# Altium PCB PCB_Palm_v2.0.PcbDoc (part 2 of 3)
Units mil, origin at the board's own origin, x right, y up, seen from the top; angles counter-clockwise.
Board outline 1773 x 1966 mil, 4 copper layers (Top Layer, Signal_1, Signal_2, Bottom Layer), stack 62.008 mil thick; 91 components, 87 nets, 389 pads, 224 vias.
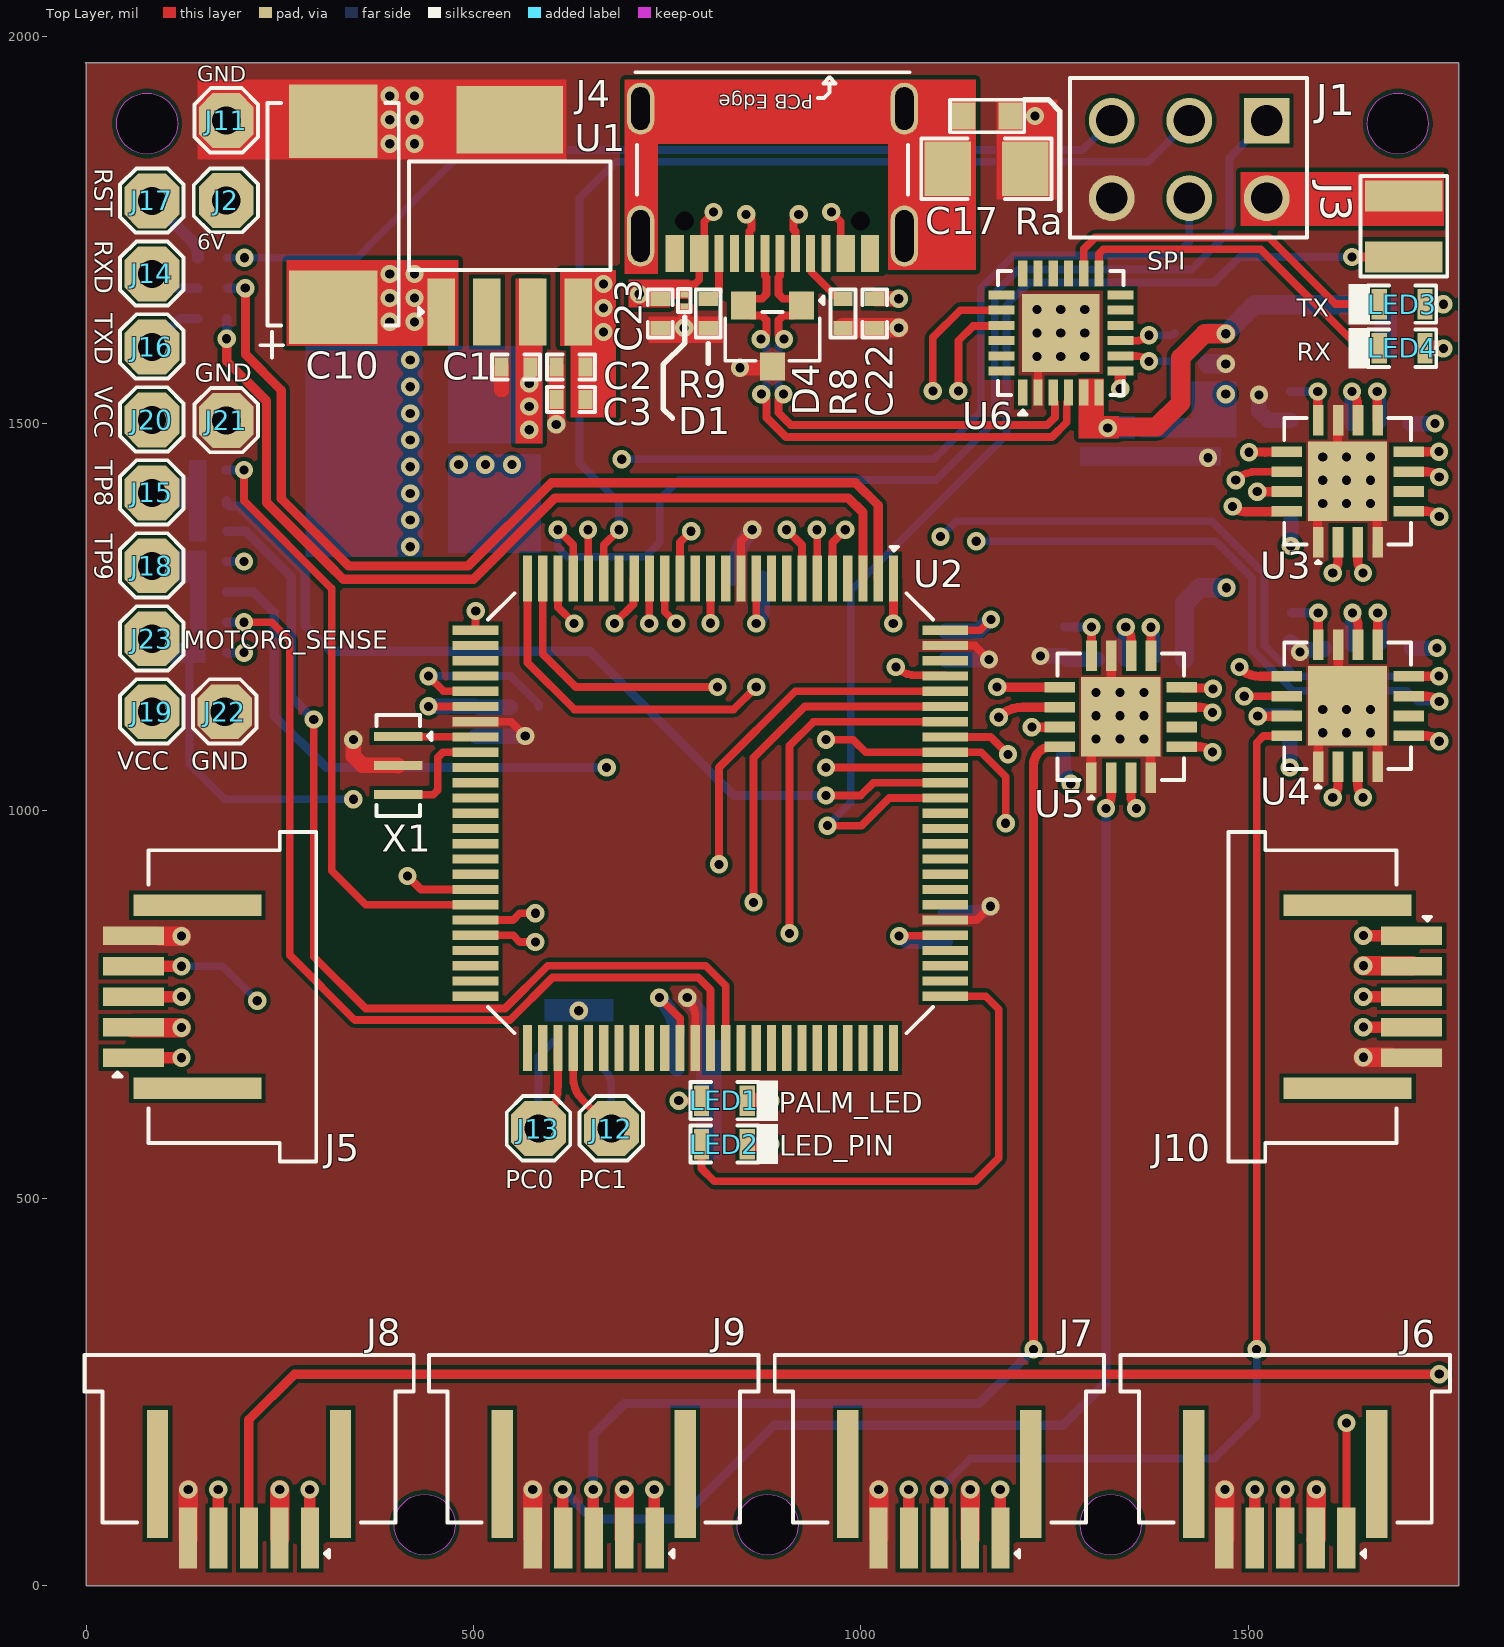
[diagram p0: Top Layer view]

## Part data (continued)
R21 R22: library part RC0402FR-07470RL, "RES 470 OHM 1% 1/16W 0402", Case Code (Imperial)=0402, Case Code (Metric)=1005, LCSC Part Number=C114877, MANUFACTURER=Yageo, Max Operating Temperature=155°C, Max Power Dissipation=63mW, Min Operating Temperature=-55°C, Package Quantity=1, Power Rating=62.5mW, Resistance Tolerance=1%, Resistor Type="Thick Film", Temperature Coefficient=100ppm/°C, Voltage Rating=50V, Case/Package=0402, ComponentLink1Description=https://datasheet.ciiva.com/46412/1018594-46412838.pdf?src-supplier=Element14, ComponentLink1URL=https://datasheet.ciiva.com/46412/1018594-46412838.pdf?src-supplier=Element14, ComponentLink2Description=https://datasheet.ciiva.com/2453/pyu-r-int-thick-7-2453377.pdf?src-supplier=Digikey, ComponentLink2URL=https://datasheet.ciiva.com/2453/pyu-r-int-thick-7-2453377.pdf?src-supplier=Digikey, ComponentLink3Description=https://datasheet.ciiva.com/2453/pyu-r-int-thick-7-2453378.pdf?src-supplier=Digikey, ComponentLink3URL=https://datasheet.ciiva.com/2453/pyu-r-int-thick-7-2453378.pdf?src-supplier=Digikey, ComponentLink4Description=https://datasheet.ciiva.com/2453/pyu-r-int-thick-7-2453376.pdf?src-supplier=Digikey, ComponentLink4URL=https://datasheet.ciiva.com/2453/pyu-r-int-thick-7-2453376.pdf?src-supplier=Digikey, ComponentLink5Description=https://datasheet.ciiva.com/7850/1018594-7850015.pdf?src-supplier=Element14, ComponentLink5URL=https://datasheet.ciiva.com/7850/1018594-7850015.pdf?src-supplier=Element14, ComponentLink6Description=https://datasheet.ciiva.com/7850/1018594-7850014.pdf?src-supplier=Element14, ComponentLink6URL=https://datasheet.ciiva.com/7850/1018594-7850014.pdf?src-supplier=Element14, ComponentLink7Description=https://datasheet.ciiva.com/15189/getdatasheetpartid-330246-15189463.pdf?src-supplier=Verical, ComponentLink7URL=https://datasheet.ciiva.com/15189/getdatasheetpartid-330246-15189463.pdf?src-supplier=Verical, Construction=Rectangular, Depth=0.5mm, Features="Moisture Resistant", Height=0.016inch, Item Type=Resistor, Lead Free="Lead Free", Length=1mm, Manufacturer Part Number=RC0402FR-07470RL, Military Standard=Not, Number of Terminations=2, Packaging="Tape and Reel", Pricing="10000=0.00085 (USD)", Reach SVHC Compliant=No, RoHS=Yes, RoHS Compliant=Yes, Series=RC, Stock=10000, Supplier=Avnet, Supplier Part Number=RC0402FR-07470RL, Termination=SMD/SMT, Tolerance=1%, Voltage Rating (AC)=50V, Width=0.02inch, Working Voltage=50V
R23: library part RT0402BRD0722K1L, "RES SMD 22.1KOHM 0.1% 1/16W 0402", Case Code (Imperial)=0402, Case Code (Metric)=1005, LCSC Part Number=C852648, MANUFACTURER=Yageo, Max Operating Temperature=155°C, Max Power Dissipation=63mW, Min Operating Temperature=-55°C, Package Quantity=10000, Power Rating=62.5mW, Temperature Coefficient=25ppm/°C, Tolerance=0.1%, Voltage Rating=50V, Case/Package=0402, Category="Chip SMD Resistors", ComponentLink1Description=https://datasheet.ciiva.com/2582/pyu-rt-1-to-0-05-rohs-l-5-2582235.pdf?src-supplier=Digi-Key, ComponentLink1URL=https://datasheet.ciiva.com/2582/pyu-rt-1-to-0-05-rohs-l-5-2582235.pdf?src-supplier=Digi-Key, ComponentLink2Description=https://datasheet.ciiva.com/12797/pyu-rt-1-to-0-05-rohs-l-4-12797086.pdf?src-supplier=Mouser, ComponentLink2URL=https://datasheet.ciiva.com/12797/pyu-rt-1-to-0-05-rohs-l-4-12797086.pdf?src-supplier=Mouser, Height=0.014inch, Item Type=Resistor, Lead Free="Lead Free", Length=0.039inch, Manufacturer Part Number=RT0402BRD0722K1L, Number of Terminations=2, Packaging="Tape and Reel", Pricing 1="10000=0.0417, 20000=0.0733, 30000=0.041, 40000=0.0719, 50000=0.0402, 100000=0.0393 (USD)", RoHS=Yes, RoHS Compliant=Yes, Series=RT, Stock 1=40000, Supplier 1="Arrow Electronics", Supplier Part Number 1=RT0402BRD0722K1L, Termination=SMD/SMT, Voltage Rating (DC)=50V, Weight=2.3E-05oz, Width=0.5mm
R24: library part 0402WGF4752TCE, "62.5mW Thick Film Resistors 50V ±100ppm/℃ ±1% 47.5kΩ 0402 Chip Resistor - Surface Mount ROHS", LCSC Part Number=C25896, MANUFACTURER=Uniroyal, Item Type=Resistor, Manufacturer Part Number=0402WGF4752TCE, RoHS=No, Supplier=LCSC
Ra: library part RC0603FR-071ML, "RES SMD 1M OHM 1% 1/10W 0603", Case Code (Imperial)=0603, Case Code (Metric)=1608, LCSC Part Number=C105578, MANUFACTURER=Yageo, Max Operating Temperature=155°C, Min Operating Temperature=-55°C, Package Quantity=5000, Power Rating=100mW, Resistance=1MR, Supplier Part Number 1=311-1.00MHRDKR-ND, Temperature Coefficient=100ppm/°C, Tolerance=1%, Voltage Rating=50V, Case/Package=0603, ComponentLink1Description=http://www.farnell.com/datasheets/2167052.pdf?src-supplier=Mouser, ComponentLink1URL=http://www.farnell.com/datasheets/2167052.pdf?src-supplier=Mouser, ComponentLink2Description=http://www.farnell.com/datasheets/2167052.pdf?src-supplier=Element14, ComponentLink2URL=http://www.farnell.com/datasheets/2167052.pdf?src-supplier=Element14, ComponentLink3Description=http://documents.rs-components.com/techlib://itc_doclist_GB.htm?stockno=5048956&src-supplier=RSComponents, ComponentLink3URL=http://documents.rs-components.com/techlib://itc_doclist_GB.htm?stockno=5048956&src-supplier=RSComponents, Composition="Thick Film", Depth=0.8mm, Height=0.45mm, Item Type=Resistor, Lead Free="Lead Free", Length=1.6mm, Manufacturer Part Number=RC0603FR-071ML, Military Standard=Not, Number of Pins=2, Packaging="Tape and Reel", Pricing 1="1=0.1, 10=0.023, 100=0.0094, 1000=0.00421, 2500=0.00366 (USD)", REACH SVHC="No SVHC", Stock 1=3824601, Supplier 1=Digi-Key, Termination=SMD/SMT, Voltage Rating (DC)=50V, Width=0.8mm
U1: "IC REG LINEAR 5V 1A SOT223-5", LCSC Part Number=C28191, MANUFACTURER="Texas Instruments", Supplier Part Number=926-38692MP-5.0/NOPB, ComponentLink1Description=https://datasheet.ciiva.com/6596/lp38690-6596184.pdf?src-supplier=Digikey, ComponentLink1URL=https://datasheet.ciiva.com/6596/lp38690-6596184.pdf?src-supplier=Digikey, ComponentLink2Description=https://datasheet.ciiva.com/6596/lp38690-6596185.pdf?src-supplier=Digikey, ComponentLink2URL=https://datasheet.ciiva.com/6596/lp38690-6596185.pdf?src-supplier=Digikey, ComponentLink3Description=https://datasheet.ciiva.com/6596/lp38690-6596186.pdf?src-supplier=Digikey, ComponentLink3URL=https://datasheet.ciiva.com/6596/lp38690-6596186.pdf?src-supplier=Digikey, ComponentLink4Description=https://datasheet.ciiva.com/14278/lp38692-14278796.pdf?src-supplier=Avnet, ComponentLink4URL=https://datasheet.ciiva.com/14278/lp38692-14278796.pdf?src-supplier=Avnet, ComponentLink5Description=https://datasheet.ciiva.com/22704/1854710-22704677.pdf?src-supplier=Element14, ComponentLink5URL=https://datasheet.ciiva.com/22704/1854710-22704677.pdf?src-supplier=Element14, Item Type=LDO, Manufacturer Part Number=LP38692MP-5.0/NOPB, Pricing="1=2.01, 10=1.71, 50=1.71, 100=1.45, 1000=0.91, 10000=0.888 (USD)", RoHS=Yes, Stock=1461, Supplier=Mouser, Thickness=1.6mm
U2: "IC MCU 8BIT 256KB FLASH 100TQFP", Case/Package=A, Frequency=16MHz, LCSC Part Number=C22460, MANUFACTURER=Microchip, Max Operating Temperature=85°C, Max Supply Voltage=5.5V, Min Operating Temperature=-40°C, Min Supply Voltage=4.5V, Operating Supply Voltage=5V, Package Body Material=Plastic, Package Code=TFQFP, Package Quantity=90, Package Shape=Square, Peak Reflow Temperature (Cel)=260°C, Supplier Part Number 1=68T2776, Temperature Grade=INDUSTRIAL, Time @ Peak Reflow Temperature-Max (s)=40s, Access Time=16us, Category=Uncategorized, ComponentLink1Description=https://datasheet.ciiva.com/22651/1698622-22651116.pdf?src-supplier=Farnell, ComponentLink1URL=https://datasheet.ciiva.com/22651/1698622-22651116.pdf?src-supplier=Farnell, ComponentLink2Description=https://datasheet.ciiva.com/15122/getdatasheetpartid-134542-15122545.pdf?src-supplier=Verical, ComponentLink2URL=https://datasheet.ciiva.com/15122/getdatasheetpartid-134542-15122545.pdf?src-supplier=Verical, ComponentLink3Description=https://datasheet.ciiva.com/29119/154804-da-01-en-atmega2560-16au-tqfp-100-29119580.pdf?src-supplier=Conrad, ComponentLink3URL=https://datasheet.ciiva.com/29119/154804-da-01-en-atmega2560-16au-tqfp-100-29119580.pdf?src-supplier=Conrad, ComponentLink4Description=https://datasheet.ciiva.com/6640/atmel-2549-8-bit-avr-microcontroller-atmega640-1280-1281-2560-2561-summary-6640293.pdf?src-supplier=Digi-Key, ComponentLink4URL=https://datasheet.ciiva.com/6640/atmel-2549-8-bit-avr-microcontroller-atmega640-1280-1281-2560-2561-summary-6640293.pdf?src-supplier=Digi-Key, ComponentLink5Description=https://datasheet.ciiva.com/1162/33246-1162139.pdf?src-supplier=Farnell, ComponentLink5URL=https://datasheet.ciiva.com/1162/33246-1162139.pdf?src-supplier=Farnell, ComponentLink6Description=https://datasheet.ciiva.com/1157/1817551-1157521.pdf?src-supplier=Element14, ComponentLink6URL=https://datasheet.ciiva.com/1157/1817551-1157521.pdf?src-supplier=Element14, ComponentLink7Description=https://datasheet.ciiva.com/16936/70123980-16936268.pdf?src-supplier=Allied+Electronics, ComponentLink7URL=https://datasheet.ciiva.com/16936/70123980-16936268.pdf?src-supplier=Allied+Electronics, Core Architecture=AVR, Data Bus Width=8b, Density=256KB, Height=1.05mm, Interface=I2C,SPI,UART,USART,EBI/EMI,2-Wire, Item Type=IC, JESD-30 Code=S-PQFP-G100, Lead Free="Lead Free", Length=14.1mm, Manufacturer Part Number=ATMEGA2560-16AU, Max Frequency=16MHz, Memory Size=256KB, Memory Type=FLASH, Moisture Sensitivity Level=3, Mount="Surface Mount", Number of ADC Channels=16, Number of I2C Channels=1, Number of I/O Lines=86, Number of I/Os=86, Number of Pins=100, Number of Programmable I/O=86, Number of PWM Channels=12, Number of SPI Channels=1, Number of Terminals/Pins=100, Number of Timers/Counters=6, Oscillator Type=Internal, Packaging=Tray, Peripherals="PWM,Brown-out Detect/Reset,POR,WDT", Pricing 1="1=12.70000 (USD)", Radiation Hardening=No, RAM Size=8KB, Reach SVHC Compliant=Yes, RoHS=Yes, RoHS Compliant=Yes, Series="AVR® ATmega", Stock 1=4, Supplier 1=Avnet, Surface Mount=Yes, Technology=CMOS, Terminal Finish=Tin, Terminal Form="Gull Wing", Terminal Position=QUAD, Termination=SMD/SMT, Watchdog Timer=Yes, Width=14.1mm
U3 U4 U5: "IC MOTOR DRIVER PAR 16QFN", LCSC Part Number=C154936, MANUFACTURER="Texas Instruments", Supplier Part Number=595-DRV8833RTYR, ComponentLink1Description=https://datasheet.ciiva.com/15109/getdatasheetpartid-567030-15109665.pdf?src-supplier=Verical, ComponentLink1URL=https://datasheet.ciiva.com/15109/getdatasheetpartid-567030-15109665.pdf?src-supplier=Verical, ComponentLink2Description=https://datasheet.ciiva.com/3229/drv8833-3229034.pdf?src-supplier=Avnet, ComponentLink2URL=https://datasheet.ciiva.com/3229/drv8833-3229034.pdf?src-supplier=Avnet, ComponentLink3Description=https://datasheet.ciiva.com/1959/drv8833-1959716.pdf?src-supplier=Digikey, ComponentLink3URL=https://datasheet.ciiva.com/1959/drv8833-1959716.pdf?src-supplier=Digikey, ComponentLink4Description=https://datasheet.ciiva.com/1959/drv8833-1959717.pdf?src-supplier=Digikey, ComponentLink4URL=https://datasheet.ciiva.com/1959/drv8833-1959717.pdf?src-supplier=Digikey, ComponentLink5Description=https://datasheet.ciiva.com/1959/drv8833-1959718.pdf?src-supplier=Digikey, ComponentLink5URL=https://datasheet.ciiva.com/1959/drv8833-1959718.pdf?src-supplier=Digikey, Item Type=IC, Manufacturer Part Number=DRV8833RTYR, Pricing="1=1.6, 10=1.36, 50=1.36, 100=1.16, 1000=0.954, 10000=0.875 (USD)", RoHS=Yes, Stock=2803, Supplier=Mouser
U6: "IC USB TO UART BRIDGE QFN24", LCSC Part Number=C969151, MANUFACTURER="Silicon Labs", Category="Interface ICs", ComponentLink1Description=https://www.silabs.com/documents/public/data-sheets/cp2102n-datasheet.pdf?src-supplier=Digi-Key, ComponentLink1URL=https://www.silabs.com/documents/public/data-sheets/cp2102n-datasheet.pdf?src-supplier=Digi-Key, Item Type=IC, Manufacturer Part Number=CP2102N-A02-GQFN24R, Pricing 1="1=2.66900, 10=2.64300, 25=2.61700, 100=2.59000, 250=2.56400 (USD)", RoHS=Yes, Stock 1=321, Supplier 1="Arrow Electronics", Supplier Part Number 1=CP2102N-A02-GQFN24R
X1: "CERAMIC RES 16.0000MHZ 15PF SMD", Case/Package=SMD/SMT, Frequency=16MHz, Frequency Stability=0.13%, Frequency Tolerance=0.07%, LCSC Part Number=C882605, MANUFACTURER=Murata, Max Operating Temperature=125°C, Min Operating Temperature=-40°C, Supplier Part Number=4126216, ComponentLink1Description=https://www.murata.com/en/products/productdata/8801162264606/SPEC-CSTNE16M0VH3C000R0.pdf?src-supplier=Digikey, ComponentLink1URL=https://www.murata.com/en/products/productdata/8801162264606/SPEC-CSTNE16M0VH3C000R0.pdf?src-supplier=Digikey, Impedance=40R, Item Type=Crystal, Manufacturer Part Number=CSTNE16M0VH3C000R0, Mounting Technology="Surface Mount", Packaging="Cut Tape", Pricing="3000=0.168, 6000=0.164, 9000=0.162, 12000=0.161, 15000=0.157 (USD)", RoHS=Yes, RoHS Compliant=Yes, Series="CERALOCK® CSTNE", Stock=3000, Supplier="Future Electronics"

## Via types
v1: diameter 23.62, hole 11.81, Top Layer to Bottom Layer, tented both sides, 223 vias
v2: diameter 23.62, hole 11.81, Top Layer to Bottom Layer, 1 vias

## Nets (pads, with @x,y where several pads share a name; then routed paths per layer and width w, separated by ;. In a path a pad name is that pad's centre, name@x,y a point inside that pad or via, vN(x,y) a via of type N, cw(c..) or ccw(c..) an arc to the next point about the centre after c; other vN are vias at no path point)
6V: C2.2 C3.2 C10.1 C11.2 C12.2 C14.2 C15.2 C18.2 C19.2 J2.1 U1.1 U1.4 U3.10 U4.10 U5.10 | length 487.6
  Top Layer w10: 658,1521.58 658,1562.58 ; 659.5,1563.08 660,1562.58 ; 660,1521.58 660.5,1521.08
  Top Layer w12: v1(1342.07,1237.42) cw(c1325.17,1220.52) 1349.07,1220.52 U5.10@1349.07,1200.42 ; v1(1633.98,1541.36) cw(c1617.08,1524.46) 1640.98,1524.46 1640.98,1504.36 U3.10@1641.74,1505.12 ; v1(1634.72,1255.64) cw(c1617.82,1238.74) 1641.72,1238.74 U4.10@1641.72,1214.58
  Bottom Layer w12: v1@1341.91,1237.26 v1(1342.07,1237.42) ; v1(1633.98,1541.36) v1@1634.5,1540.84
  Bottom Layer w20: C19.2@1341.91,1196.06 v1@1341.91,1237.26 ; C12.2@1634.5,1500 v1@1634.5,1540.84 ; C15.2@1635.24,1214.28 v1@1635.24,1255.12 ; C11.2@1709.5,1500 v1(1741.26,1500) ; C14.2@1710.24,1210.22 v1(1743.81,1210.22)
  Bottom Layer w25: C18.2@1417.91,1196.06 1417.91,1267.91 1438,1288 v1(1472,1288)
  other v1: 668,1618.25 392,1631.25 424,1631.25 668,1649.12 392,1662.12 424,1662.12 668,1680 392,1693 424,1693
22_BREAKOUT: U2.78
23_BREAKOUT: U2.77
A1_M1: J5.3 U3.16 | length 2020.1
  Top Layer w12: v1@1479.47,1392.93 ccw(c1495.94,1409.39) 1495.94,1386.11 U3.16@1549.58,1386.11
  Top Layer w15: J5.3@59.61,760.24 v1@124.29,760.24
  Signal_2 w12: v1(123.29,760.24) 170.24,760.24 234,824 234,1249 283,1298 674,1298 788,1412 1460.93,1412 v1(1480,1392.93)
A1_M3: J7.3 U4.16 | length 1424.9
  Top Layer w10: v1(1511,305) 1511,1088 1519.84,1096.84 U4.16@1549.58,1096.84
  Top Layer w15: J7.3@1101.33,60.32 v1@1101.33,125
  Bottom Layer w10: v1(1101.33,124) 1141.33,164 1456,164 1511,219 v1(1511,305)
A1_M5: J9.3 U5.16 | length 1551
  Top Layer w12: v1(1223,305) 1223,1059.1 cw(c1246.9,1059.1) 1230,1076 cw(c1246.13,1059.88) 1246.13,1082.68 U5.16@1256.93,1082.68
  Top Layer w15: J9.3@654.67,60.32 v1@654.67,125
  Bottom Layer w12: v1(654.67,124) 654.67,194.67 695,235 1153,235 v1(1223,305)
A2_M1: J5.4 U3.2 | length 2195.8
  Top Layer w12: v1(1609.1,1307.2) ccw(c1592.64,1323.66) 1615.92,1323.66 U3.2@1615.92,1346.88
  Top Layer w15: J5.4@59.61,799.59 v1(123.29,799.59)
  Signal_2 w10: v1(221,755) 250,784 250,1239 293,1282 744,1282 856,1394 1432,1394 1460,1366 1583,1366 1609.1,1339.9 v1(1609.1,1307.2)
  Bottom Layer w10: v1(123.29,799.59) 176.41,799.59 v1(221,755)
A2_M3: J7.4 U4.2 | length 1604.7
  Top Layer w12: v1(1609.1,1017.42) ccw(c1592.64,1033.88) 1615.92,1033.88 U4.2@1615.92,1057.1
  Top Layer w15: J7.4@1061.98,60.32 v1(1061.98,124)
  Signal_1 w12: v1(1061.98,124) 1100.98,163 1633,163 1691,221 1691,935.52 v1(1609.1,1017.42)
A2_M5: J9.4 U5.2 | length 1635.9
  Top Layer w12: v1(1316.45,1003.26) ccw(c1299.99,1019.72) 1323.27,1019.72 U5.2@1323.27,1042.94
  Top Layer w15: J9.4@615.32,60.32 v1(615.32,124)
  Bottom Layer w12: v1(615.32,124) 653.32,86 767,86 888,207 1261,207 1316.45,262.45 v1(1316.45,1003.26)
ADC8_BREAKOUT: J3.2 R2.2 U2.89 | length 1517.4
  Top Layer w10: v1(957,981) 1001,981 1036.69,1016.68 U2.89@1109.15,1016.68
  Top Layer w12: v1(1634,1715) J3.2@1700.74,1715
  Bottom Layer w10: v1(957,981) 987,1011 987,1284 1188,1485 1188,1652.79 1217.21,1682 1456,1682 1489,1715 v1(1634,1715)
  Bottom Layer w12: v1(1634,1715) R2.2@1678.5,1715
ADC9_BREAKOUT: U2.88
B1_M2: J6.3 U3.5 | length 1504
  Top Layer w12: U3.5@1707.06,1386.62 1730.28,1386.62 cw(c1730.28,1363.34) v1(1746.74,1379.8)
  Top Layer w15: J6.3@1548,60.32 v1(1548,124) v1@1548,125
  Signal_2 w10: v1(1548,124) 1578,154 1680,154 1722,196 1722,1355.06 v1(1746.74,1379.8)
B1_M4: J8.3 U4.5 | length 2573.4
  Top Layer w12: J8.3@210,60.32 210,214 269,273 v1(1746.74,273) ; U4.5@1707.06,1096.84 1730.28,1096.84 cw(c1730.28,1073.55) v1(1746.74,1090.02)
  Signal_2 w12: v1(1746.74,273) v1(1746.74,1090.02)
B1_M6: J10.3 U5.5 | length 550.4
  Top Layer w12: U5.5@1414.41,1082.68 1437.62,1082.68 cw(c1437.62,1059.4) v1(1454.08,1075.86)
  Top Layer w15: v1@1647.67,760.24 J10.3@1712.35,760.24
  Signal_1 w12: v1(1454.08,1075.86) 1488.14,1075.86 1556,1008 1556,805 1600.76,760.24 v1(1648.67,760.24)
B2_M2: J6.4 U3.3 | length 1477.3
  Top Layer w12: U3.3@1641.52,1346.88 1641.52,1323.66 ccw(c1664.81,1323.66) v1(1648.34,1307.2)
  Top Layer w15: J6.4@1508.65,60.32 v1(1508.65,124)
  Signal_2 w10: v1(1508.65,124) 1558.65,174 1671,174 1707,210 1707,1277 1676.8,1307.2 v1(1648.34,1307.2)
B2_M4: J8.4 U4.3 | length 2706.4
  Top Layer w12: U4.3@1641.52,1057.1 1641.52,1033.88 ccw(c1664.81,1033.88) v1(1648.34,1017.42)
  Top Layer w15: J8.4@170.65,60.32 v1(170.65,124)
  Signal_1 w10: v1(170.65,124) 170.65,67.35 217,21 1650,21 1709,80 1709,956.76 v1(1648.34,1017.42)
B2_M6: J10.4 U5.3 | length 607.1
  Top Layer w12: U5.3@1348.87,1042.94 1348.87,1019.72 ccw(c1372.15,1019.72) v1(1355.69,1003.26)
  Top Layer w15: v1(1648.67,720.89) J10.4@1712.35,720.89
  Signal_1 w12: v1(1355.69,1003.26) 1476.74,1003.26 1536,944 1536,787 1602.11,720.89 v1(1648.67,720.89)
CP_VDD: C27.1 C28.1 R20.2 R21.1 R22.1 U6.5 U6.6 | length 604
  Top Layer w8: 1288.23,1494.34 1287.76,1494.82 U6.5@1287.76,1540.07 U6.6@1307.44,1540.07
  Top Layer w20: v1(1318.73,1494.34) v1@1319.89,1495.5
  Top Layer w25: v1@1319.89,1495.5 1381.89,1495.5 1413,1526.61 1413,1585 1444,1616 v1(1471,1616)
  Bottom Layer w20: R22.1@1680.5,1597 1680.5,1624.5 R21.1@1680.5,1654
  Bottom Layer w25: R20.2@1449,1616.84 1470.16,1616.84 v1(1471,1616) 1508.5,1653.5 1675.5,1653.5 R21.1@1677,1652